# Altium PCB 400535.PcbDoc (part 2 of 3)
Units mil, origin at the board's own origin, x right, y up, seen from the top; angles counter-clockwise.
Board outline 2125.98 x 2500 mil, 4 copper layers (Top Layer, Mid-Layer 1, Mid-Layer 2, Bottom Layer), stack 93.792 mil thick; 80 components, 40 nets, 250 pads, 682 vias.
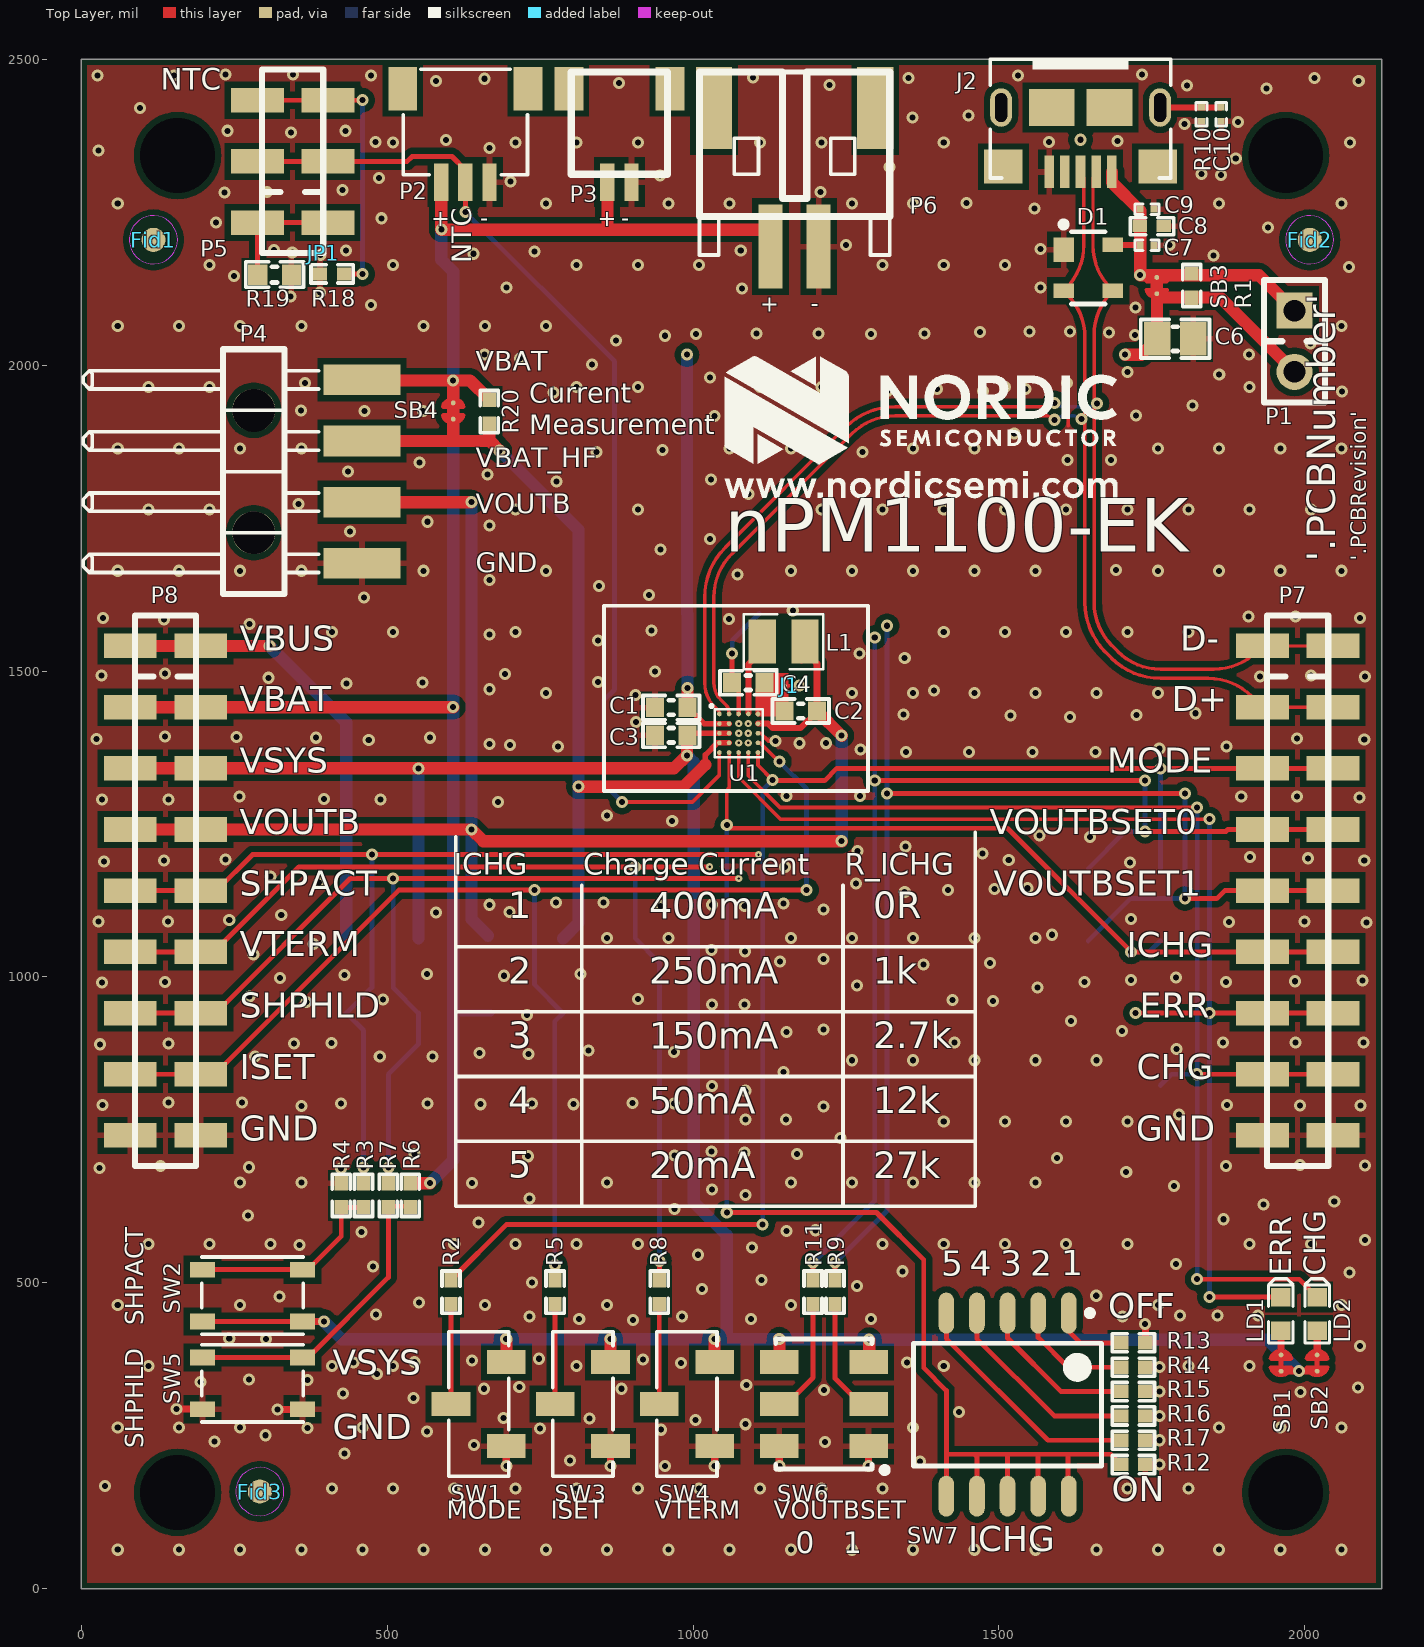
[diagram p0: Top Layer view]

## Via types
v1: diameter 19.68, hole 9.84, Top Layer to Bottom Layer, tented both sides, 673 vias
v2: diameter 11.81, hole 3.94, Top Layer to Mid-Layer 1, tented top, 8 vias
v3: diameter 11.81, hole 3.94, Top Layer to Mid-Layer 1, tented both sides, 1 vias

## Nets (pads, with @x,y where several pads share a name; then routed paths per layer and width w, separated by ;. In a path a pad name is that pad's centre, name@x,y a point inside that pad or via, vN(x,y) a via of type N, cw(c..) or ccw(c..) an arc to the next point about the centre after c; other vN are vias at no path point) (continued)
D_N: (continued)
  Top Layer w5.51: U1.A1@1043.13,1429.8 ccw(c1033.81,1429.8) 1040.4,1436.39 1035.39,1441.39 cw(c1074.97,1480.97) 1019,1480.97 1019,1620.58 cw(c1134,1620.58) 1052.68,1701.9 1249.1,1898.32 cw(c1330.42,1817) 1330.42,1932 1578.12,1932 ccw(c1578.12,1950.21) v1@1591,1937.33 ; J2.2@1658.94,2315.65 ccw(c1671.73,2302.87) 1653.65,2302.87 1653.65,2195.73 ccw(c1753.65,2195.73) 1682.94,2125.02 D1.3@1686.35,2121.6 1684.79,2120.03 ccw(c1755.5,2049.32) 1655.5,2049.32 1655.5,1611.92 ccw(c1755.5,1611.92) 1684.79,1541.21 1694,1532 ccw(c1764.01,1602.01) 1764.01,1503 1851.09,1503 ccw(c1851.09,1603) 1921.8,1532.29 P7.1@1930.51,1541 P7.1@2045.87,1541
  Bottom Layer w5.51: v1(1591,1938.33) ccw(c1606.29,1953.63) 1606.29,1932 1647.12,1932 ccw(c1647.12,1950.21) v1(1660,1937.33)
D_P: D1.2 J2.3 P7.2 TP5.1 U1.A2 | length 2157.3
  Top Layer w5.51: U1.A2@1058.87,1429.8 cw(c1060.68,1431.61) 1058.13,1431.61 1058.13,1435.21 ccw(c1046.87,1435.21) 1054.83,1443.17 1046,1452 cw(c1074.97,1480.97) 1034,1480.97 1034,1620.58 cw(c1134,1620.58) 1063.29,1691.29 1259.71,1887.71 cw(c1330.42,1817) 1330.42,1917 1578.12,1917 cw(c1578.12,1898.79) v1@1591,1911.67 ; J2.3@1633.35,2315.65 cw(c1620.57,2302.87) 1638.65,2302.87 1638.65,2196.02 cw(c1538.65,2196.02) 1609.36,2125.31 D1.2@1605.65,2121.6 1611.21,2116.03 cw(c1540.5,2045.32) 1640.5,2045.32 1640.5,1611.92 ccw(c1755.5,1611.92) 1674.18,1530.6 1683.39,1521.39 ccw(c1764.01,1602.01) 1764.01,1488 1842.09,1488 cw(c1842.09,1388) 1912.8,1458.71 P7.2@1930.51,1441 P7.2@2045.87,1441
  Bottom Layer w5.51: v1(1591,1910.67) cw(c1606.29,1895.37) 1606.29,1917 1622.12,1917 cw(c1622.12,1898.79) v1(1635,1911.67)
DEC: C4.2 TP2.1 U1.A3 | length 187
  Top Layer w7.87: v1(1064,1529) 1063.79,1528.8 C4.2@1063.79,1480.98 1074.62,1470.16 U1.A3@1074.62,1429.8
  Bottom Layer w7.87: v1(1064,1529) 1064,1549.89 TP2.1@1108.11,1594